# Altium PCB ECG_Final.PcbDoc (part 2 of 3)
Units mil, origin at the board's own origin, x right, y up, seen from the top; angles counter-clockwise.
Board outline 2555.63 x 1380.57 mil, 4 copper layers (Top Layer, Layer 1, Layer 2, Bottom Layer), stack 61.583 mil thick; 110 components, 95 nets, 402 pads, 94 vias.
Unrouted connection lines stored in the file: 82.
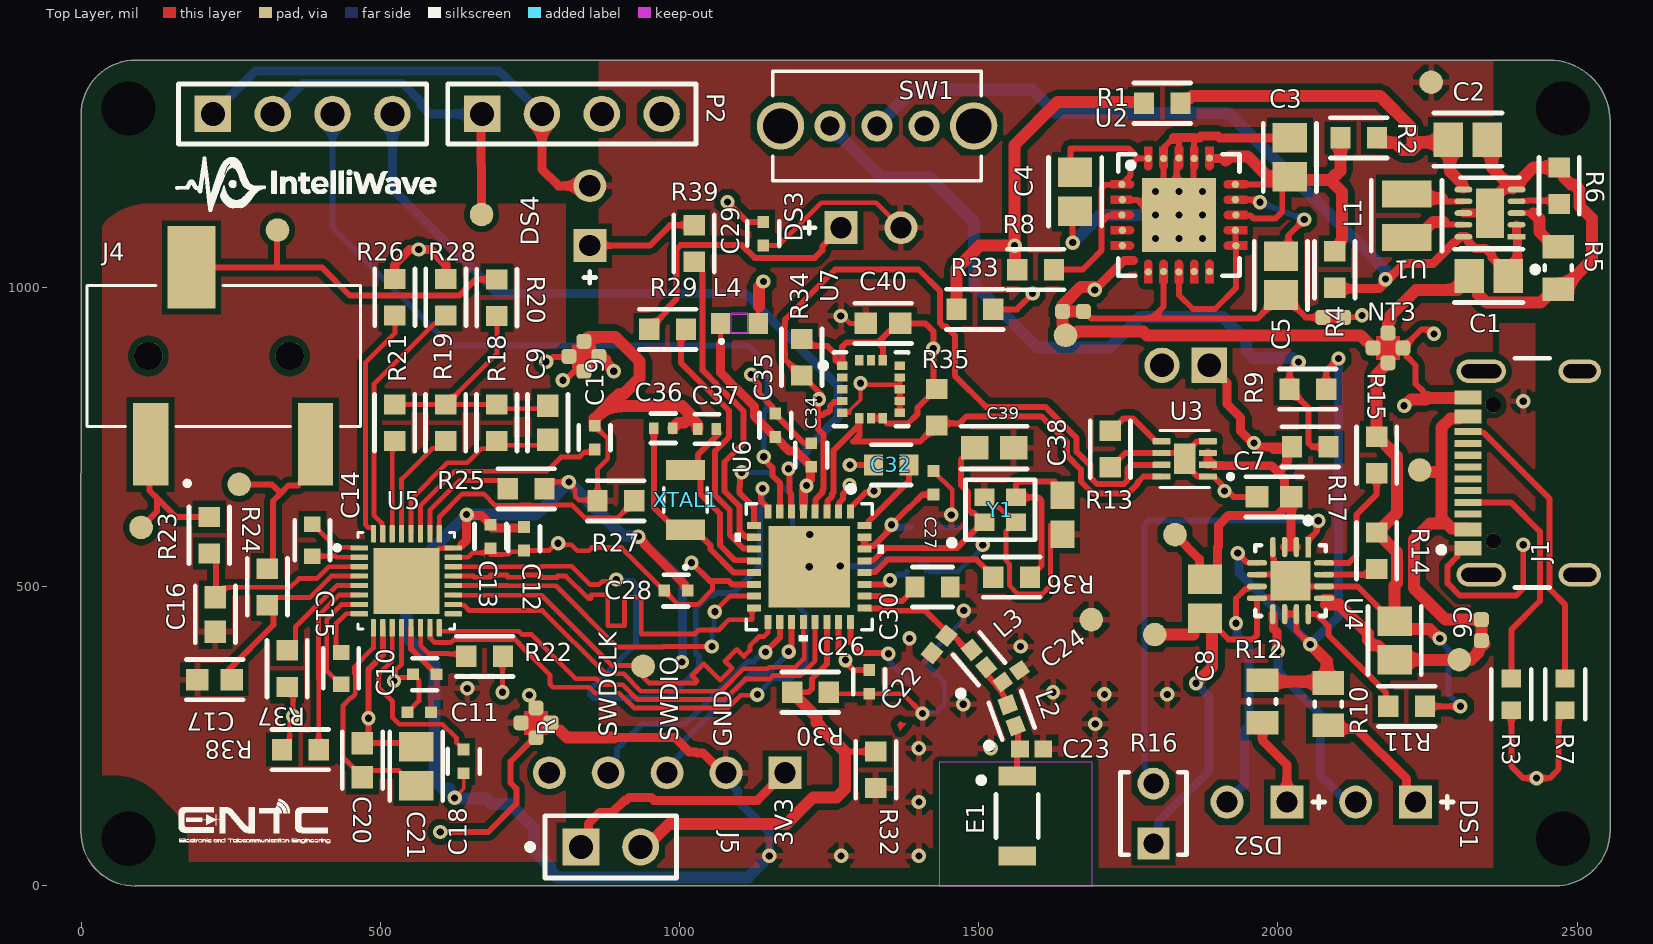
[diagram p0: Top Layer view]

## Part data (continued)
R6: library part "8.25k RES-0603-IPC-B_1", "Res Thin Film 0603 8.25K Ohm 0.1% 0.1W(1/10W) ±25ppm/C Pad SMD T/R Automotive AEC-Q200", Case Code (Imperial)=0603, Case Code (Metric)=1608, Manufacturer=Panasonic, Manufacturer Lifecycle Status=ACTIVE, Manufacturer Part Number=ERA3AEB8251V, Max Operating Temperature=155°C, Max Power Dissipation=100mW, Min Operating Temperature=-55°C, Ratings=AEC-Q200, Resistance=4.7kR, Resistor Type="Thin Film", Temperature Coefficient=50ppm/°C, Tolerance=0.5%, Voltage Rating=75V, Case/Package=0603, Category="Chip SMD Resistors", ComponentLink1Description=https://datasheet.octopart.com:443/ERA3AEB8251V-Panasonic-datasheet-62287448.pdf?src-supplier=Future+Electronics, ComponentLink1URL=https://datasheet.octopart.com:443/ERA3AEB8251V-Panasonic-datasheet-62287448.pdf?src-supplier=Future+Electronics, ComponentLink2Description=https://datasheet.octopart.com:443/ERA3AEB8251V-Panasonic-datasheet-8367715.pdf?src-supplier=Newark, ComponentLink2URL=https://datasheet.octopart.com:443/ERA3AEB8251V-Panasonic-datasheet-8367715.pdf?src-supplier=Newark, ComponentLink3Description=https://datasheet.octopart.com:443/ERA3AEB8251V-Panasonic-datasheet-136531316.pdf?src-supplier=Newark, ComponentLink3URL=https://datasheet.octopart.com:443/ERA3AEB8251V-Panasonic-datasheet-136531316.pdf?src-supplier=Newark, ComponentLink4Description=https://datasheet.octopart.com:443/ERA-3AEB8251V-Panasonic-datasheet-184398012.pdf?src-supplier=Newark, ComponentLink4URL=https://datasheet.octopart.com:443/ERA-3AEB8251V-Panasonic-datasheet-184398012.pdf?src-supplier=Newark, ComponentLink5Description=https://datasheet.octopart.com:443/ERA-3AEB8251V-Panasonic-datasheet-154766165.pdf?src-supplier=JRH+Electronics, ComponentLink5URL=https://datasheet.octopart.com:443/ERA-3AEB8251V-Panasonic-datasheet-154766165.pdf?src-supplier=JRH+Electronics, ComponentLink6Description=https://datasheet.octopart.com:443/ERA3AEB8251V-Panasonic-datasheet-13266200.pdf?src-supplier=_legacy+Avnet, ComponentLink6URL=https://datasheet.octopart.com:443/ERA3AEB8251V-Panasonic-datasheet-13266200.pdf?src-supplier=_legacy+Avnet, ComponentLink7Description=https://datasheet.octopart.com:443/ERA3AEB8251V-Panasonic-datasheet-12510007.pdf?src-supplier=_legacy+Avnet, ComponentLink7URL=https://datasheet.octopart.com:443/ERA3AEB8251V-Panasonic-datasheet-12510007.pdf?src-supplier=_legacy+Avnet, ComponentLink8Description=https://datasheet.octopart.com:443/ERA3AEB8251V-Panasonic-datasheet-11763931.pdf?src-supplier=_legacy+Avnet, ComponentLink8URL=https://datasheet.octopart.com:443/ERA3AEB8251V-Panasonic-datasheet-11763931.pdf?src-supplier=_legacy+Avnet, ComponentLink9Description=https://datasheet.octopart.com:443/ERA3AEB8251V-Panasonic-datasheet-10840895.pdf?src-supplier=_legacy+Avnet, ComponentLink9URL=https://datasheet.octopart.com:443/ERA3AEB8251V-Panasonic-datasheet-10840895.pdf?src-supplier=_legacy+Avnet, ComponentLink10Description=https://datasheet.octopart.com:443/ERA3AEB8251V-Panasonic-datasheet-5392808.pdf?src-supplier=_legacy+Avnet, ComponentLink10URL=https://datasheet.octopart.com:443/ERA3AEB8251V-Panasonic-datasheet-5392808.pdf?src-supplier=_legacy+Avnet, ComponentLink11Description=https://datasheet.octopart.com:443/ERA3AEB8251V-Panasonic-datasheet-188913046.pdf?src-supplier=TME, ComponentLink11URL=https://datasheet.octopart.com:443/ERA3AEB8251V-Panasonic-datasheet-188913046.pdf?src-supplier=TME, ComponentLink12Description=https://sigma.octopart.com:443/150570796/technical_drawing/Panasonic-ERA3AEB8251V.pdf?src-supplier=Panasonic+SCT, ComponentLink12URL=https://sigma.octopart.com:443/150570796/technical_drawing/Panasonic-ERA3AEB8251V.pdf?src-supplier=Panasonic+SCT, ComponentLink13Description=https://datasheet.octopart.com:443/ERA3AEB8251V-Panasonic-datasheet-138783076.pdf?src-supplier=Burklin+Elektronik, ComponentLink13URL=https://datasheet.octopart.com:443/ERA3AEB8251V-Panasonic-datasheet-138783076.pdf?src-supplier=Burklin+Elektronik, ComponentLink14Description=https://datasheet.octopart.com/ERA3AEB8251V-Panasonic-datasheet-78375410.pdf, ComponentLink14URL=https://datasheet.octopart.com/ERA3AEB8251V-Panasonic-datasheet-78375410.pdf, ComponentLink15Description=https://datasheet.octopart.com:443/ERA3AEB8251V-Panasonic---ECG-datasheet-15994758.pdf?src-supplier=Farnell, ComponentLink15URL=https://datasheet.octopart.com:443/ERA3AEB8251V-Panasonic---ECG-datasheet-15994758.pdf?src-supplier=Farnell, ComponentLink16Description=https://datasheet.octopart.com:443/ERA3AEB8251V-Panasonic-datasheet-33006989.pdf?src-supplier=Electro+Sonic, ComponentLink16URL=https://datasheet.octopart.com:443/ERA3AEB8251V-Panasonic-datasheet-33006989.pdf?src-supplier=Electro+Sonic, ComponentLink17Description=https://datasheet.octopart.com:443/ERA-3AEB8251V-Panasonic-datasheet-46744048.pdf?src-supplier=Electro+Sonic, ComponentLink17URL=https://datasheet.octopart.com:443/ERA-3AEB8251V-Panasonic-datasheet-46744048.pdf?src-supplier=Electro+Sonic, Composition="Thin Film", Contact Plating=Tin, Country of Origin=Japan, Depth=800µm, Export Control Classification Number (ECCN) Code=EAR99, Features="Moisture Resistant", Harmonized Tariff Schedule (HTS) Code=8533.21.00.30, Height=0.022inch, Introduction Date=2011-03-24, Lead Free="Lead Free", Length=0.063inch, Lifecycle Status=Production, Military Standard=Not, Mounting Technology="Surface Mount", Number of Terminals=2, Number of Terminations=2, Packaging="Tape and Reel", Part Series="Thin Film Chip Resistors, High Reliability Type", Pins=2, Power Rating=100mW, Pricing="5000=0.0315 (GBP)", Radiation Hardening=No, REACH SVHC=Yes, RoHS=Compliant, RoHS Compliant=Yes, Schedule B="8533210045, 8533210045|8533210045, 8533210045|8533210045|8533210045, 8533210045|8533210045|8533210045|8533210045", Series=AT, Stock=5000, Supplier=Farnell, Supplier Part Number=ERA3AEB8251V, Termination=SMD/SMT, Voltage Rating (DC)=75V, Width=0.032inch, Working Voltage=75V
R10 R12: library part RES-0805-IPC_B
R11 R23 R24: library part "1.18k RES-0603-IPC-B_3", Case/Package=0603, Max Operating Temperature=155°C, Max Power Dissipation=100mW, Min Operating Temperature=-55°C, Resistance=4.7kR, Resistor Type="Thin Film", Temperature Coefficient=50ppm/°C, Tolerance=0.5%, Features="Moisture Resistant", Height=0.022inch, Length=0.063inch, Number of Terminations=2, Packaging="Tape and Reel", RoHS Compliant=Yes, Series=AT, Width=0.032inch
R13: Case/Package=0603, Max Operating Temperature=155°C, Max Power Dissipation=100mW, Min Operating Temperature=-55°C, Resistance=4.7kR, Resistor Type="Thin Film", Temperature Coefficient=50ppm/°C, Tolerance=0.5%, Features="Moisture Resistant", Height=0.022inch, Length=0.063inch, Number of Terminations=2, Packaging="Tape and Reel", RoHS Compliant=Yes, Series=AT, Width=0.032inch
R14: library part "4.12k RES-0603-IPC-B_1", Case/Package=0603, Max Operating Temperature=155°C, Max Power Dissipation=100mW, Min Operating Temperature=-55°C, Resistance=4.7kR, Resistor Type="Thin Film", Temperature Coefficient=50ppm/°C, Tolerance=0.5%, Features="Moisture Resistant", Height=0.022inch, Length=0.063inch, Number of Terminations=2, Packaging="Tape and Reel", RoHS Compliant=Yes, Series=AT, Width=0.032inch
R15: library part "1.13k RES-0603-IPC-B_2", Case/Package=0603, Max Operating Temperature=155°C, Max Power Dissipation=100mW, Min Operating Temperature=-55°C, Resistance=4.7kR, Resistor Type="Thin Film", Temperature Coefficient=50ppm/°C, Tolerance=0.5%, Features="Moisture Resistant", Height=0.022inch, Length=0.063inch, Number of Terminations=2, Packaging="Tape and Reel", RoHS Compliant=Yes, Series=AT, Width=0.032inch
R16: library part CMP-02404-000013-1, "THERM NTC 10KOHM 3435K RADIAL", Case/Package=Radial, Max Operating Temperature=125°C, Max Power Dissipation=250mW, Min Operating Temperature=-40°C, Tolerance=1%, Mount="Through Hole", Packaging=Bulk, RoHS Compliant=Yes
R18 R37 R38: library part "1M RES-0603-IPC-B_3", Case/Package=0603, Max Operating Temperature=155°C, Max Power Dissipation=100mW, Min Operating Temperature=-55°C, Resistance=4.7kR, Resistor Type="Thin Film", Temperature Coefficient=50ppm/°C, Tolerance=0.5%, Features="Moisture Resistant", Height=0.022inch, Length=0.063inch, Number of Terminations=2, Packaging="Tape and Reel", RoHS Compliant=Yes, Series=AT, Width=0.032inch
R19 R20 R32: library part "100k RES-0603-IPC-B_1", Case/Package=0603, Max Operating Temperature=155°C, Max Power Dissipation=100mW, Min Operating Temperature=-55°C, Resistance=4.7kR, Resistor Type="Thin Film", Temperature Coefficient=50ppm/°C, Tolerance=0.5%, Features="Moisture Resistant", Height=0.022inch, Length=0.063inch, Number of Terminations=2, Packaging="Tape and Reel", RoHS Compliant=Yes, Series=AT, Width=0.032inch
R21: library part "1k RES-0603-IPC-B_1", Case/Package=0603, Max Operating Temperature=155°C, Max Power Dissipation=100mW, Min Operating Temperature=-55°C, Resistance=4.7kR, Resistor Type="Thin Film", Temperature Coefficient=50ppm/°C, Tolerance=0.5%, Features="Moisture Resistant", Height=0.022inch, Length=0.063inch, Number of Terminations=2, Packaging="Tape and Reel", RoHS Compliant=Yes, Series=AT, Width=0.032inch
R22 R25 R26 R27 R28 R30 R34 R35: library part "10k RES-0603-IPC-B_1_1", Case/Package=0603, Max Operating Temperature=155°C, Max Power Dissipation=100mW, Min Operating Temperature=-55°C, Resistance=4.7kR, Resistor Type="Thin Film", Temperature Coefficient=50ppm/°C, Tolerance=0.5%, Features="Moisture Resistant", Height=0.022inch, Length=0.063inch, Number of Terminations=2, Packaging="Tape and Reel", RoHS Compliant=Yes, Series=AT, Width=0.032inch
SW1: "Description", Manufacturer_Name="C&K Components", Copyright="Copyright (C) 2025 Ultra Librarian. All rights reserved.", Manufacturer_Part_Number=OS102011MA1QN1, RefDes=RefDes, Type=Type
U1: library part CMP-04918-000700-1, "1.8-V TO 5.5-V, 75-NA IQ BUCK-BO", RoHS Compliant=Yes
U2: library part CMP-04917-000027-1, "IC REG LINEAR POS ADJ 1A 20VQFN", Dropout Voltage=307mV, Manufacturer="Texas Instruments", Max Junction Temp=+125°C, Max Supply Voltage=35V, Min Supply Voltage=3V, Nominal Supply Current=0.58-6.1mA, Output Current=1A, Output Voltage=1.4-20.5V, Package=RGW0020A, Temperature="-40°C to +125°C", Temperature Range Low=-40°C, Accuracy Percentage=1%, Automotive=No, Category=IC, ComponentLink2Description=Datasheet, ComponentLink2URL=http://www.ti.com/lit/ds/symlink/tps7a47.pdf, Device Class L1="Integrated Circuits (ICs)", Device Class L2="Power Management ICs", Device Class L3="Voltage Regulators - Linear", Digikey Description="IC REG LINEAR POS ADJ 1A 20VQFN", Height=1mm, Lead Free=Yes, Manufacturer Part Number=TPS7A4700RGWR, Mouser Description="LDO Voltage Regulators Low Noise,1A,Hi Vltg LDO Reg", Number of Outputs=1, Octopart=https://octopart.com/tps7a4700rgwr-texas+instruments-21221956, Output Type=AdjustableProgrammable, RoHS=TRUE, Standoff Height=0mm, Temperature Range High=+125°C
U3: "3ÂµA 1-Cell/2-Cell Fuel Gauge with ModelGauge", Package="TDFN-8 Maxim", Availability="In Stock", Check_prices=https://www.snapeda.com/parts/MAX17048G+T10/Analog+Devices/view-part/?ref=eda, MF="Analog Devices", MP=MAX17048G+T10, Price=None, Purchase-URL=https://pricing.snapeda.com/search/part/MAX17048G+T10/?ref=eda, SnapEDA_Link=https://www.snapeda.com/parts/MAX17048G+T10/Analog+Devices/view-part/?ref=snap
U4: library part CMP-0321-00220-3, "IC LI-ION CHARGE MGMT 16-QFN", Battery Pack Voltage=4.2V, Case/Package=VQFN, Max Charge Current=1.5A, Max Operating Temperature=125°C, Max Supply Voltage=10.2V, Min Input Voltage=4.3V, Min Operating Temperature=-40°C, Min Supply Voltage=4.35V, Package Quantity=3000, Battery Chemistry=LITHIUM-ION, Contact Plating=Gold, Fault Protection="Over Voltage", Interface=USB, Lead Free="Lead Free", Number of Cells=1, Number of Pins=16, Output Current=1.5A, Output Voltage=4.2V, Packaging="Tape and Reel", Radiation Hardening=No, RoHS Compliant=Yes, Series=-, Weight=0.000808oz
U5: "24-bit, 2-ch, Low-Power Analog Front END (AFE) for ECG Applications", Package="VQFN-32 Texas Instruments", Check_prices=https://www.snapeda.com/parts/ADS1292IRSMR/Texas+Instruments/view-part/?ref=eda, MF="Texas Instruments", MP=ADS1292IRSMR, SnapEDA_Link=https://www.snapeda.com/parts/ADS1292IRSMR/Texas+Instruments/view-part/?ref=snap
U6: "Ultra-low-power, Arm Cortex-M33 Trust Zone MCU 100 MHz with 1 Mbyte of Flash memory,  Bluetooth LE 5.4", Manufacturer_Name=STMicroelectronics, Copyright="Copyright (C) 2025 Ultra Librarian. All rights reserved.", Manufacturer_Part_Number=STM32WBA52KGU6, RefDes=RefDes, Type=Type
U7: library part CMP-0234-00055-6, "ACCEL 2-16G I2C/SPI 16LGA", Case/Package=LGA, Max Operating Temperature=85°C, Max Supply Voltage=3.6V, Min Operating Temperature=-40°C, Min Supply Voltage=1.71V, Operating Supply Current=11uA, Operating Supply Voltage=2.5V, Package Quantity=1, Axis="X, Y, Z", Bandwidth=5kHz, Contact Plating=Gold, Depth=3mm, Height=1mm, Interface=I2C, Lead Free="Lead Free", Length=3mm, Max Supply Voltage (DC)=3.6V, Min Supply Voltage (DC)=1.71V, Number of Pins=16, Output Type=Digital, Packaging="Tape and Reel", Radiation Hardening=No, REACH SVHC="No SVHC", Resolution=16b, RoHS Compliant=Yes, Sensor Type="3 Axis", Series=-, Width=3mm
XTAL1: "Description", Manufacturer_Name=NDK, Copyright="Copyright (C) 2025 Ultra Librarian. All rights reserved.", Manufacturer_Part_Number=NX3215SA-32.768K-STD-MUA-14, Type=Crystals
Y1: library part CMP-200220-000017-1, "CRYSTAL 32.0000MHZ 8PF SMD", Case/Package=SMD/SMT, ESR (Equivalent Series Resistance)=60R, Frequency=32MHz, Load Capacitance=8pF, Max Operating Temperature=125°C, Min Operating Temperature=-40°C, Ratings=AEC-Q200, Mount="Surface Mount", Packaging="Tape and Reel"

## Free pads (board coordinates)
  round 0 hole 90.55: 2(78.74,78.74) 2(78.74,1299.21) 2(2476.34,78.74) 2(2476.34,1299.21)
  round 39.37 smd: 3(100,599) 3(264,671) 3(328,1096) 3(669,1122) 3(939,367) 3(1645,920) 3(1688,445) 3(1794,420) 3(1828,587) 3(2237,695) 3(2256,1343) 3(2303,378)

## Via types
v1: diameter 24, hole 12, Top Layer to Bottom Layer, 84 vias
v2: diameter 23.62, hole 11.81, Top Layer to Bottom Layer, 9 vias
v3: diameter 24/24/24/24 (per signal layer), hole 12, Top Layer to Bottom Layer, 1 vias

## Nets (pads, with @x,y where several pads share a name; then routed paths per layer and width w, separated by ;. In a path a pad name is that pad's centre, name@x,y a point inside that pad or via, vN(x,y) a via of type N, cw(c..) or ccw(c..) an arc to the next point about the centre after c; other vN are vias at no path point)
5V: C6.2 NT1.2 pad.3@2303,378 U4.13 | length 335.8
  Top Layer w15: U4.13@2077.05,480.63 U4.13@2088.81,480.63
  Top Layer w20: 2080,470 2102.49,470 2150.33,422.15 2150.33,411.19 2159.71,401.81 2166.71,401.81 2191.03,377.49 2322.49,377.49 2335,390 2335,394.32 2345,404.32 NT1.2@2345,405
ADC1: P1.4 U6.6 | length 1252
  Top Layer w10: v1(1182,697) 1183.43,695.57 1183.43,658.68 1186.09,656.02 U6.6@1186.09,625.91
  Bottom Layer w15: P1.4@520,1290 520,1165 695,990 1110,990 1264.55,835.45 1264.55,782.38 1212.19,730.02 1212.19,726.21 1182.98,697 v1(1182,697)
ADC2: P1.3 U6.7 | length 1270.1
  Top Layer w10: v1(1140.67,717) 1140.67,713.21 1155,698.88 1155,685.82 1167.43,673.39 U6.7@1167.43,625.91
  Bottom Layer w10: P1.3@420,1290 420,1100 617,903 1114.54,903 1146.61,870.93 1146.61,797.05 1140.67,791.1 v1(1140.67,717)
ADC3: 
ADC4: 
ADS_CS: U5.18 U6.20 | length 730.3
  Top Layer w8: U5.18@621.87,470.38 622.2,470.05 634.81,470.05 635.89,468.96 639.94,468.96 648.91,460 770.71,460 876.34,354.37 906.34,354.37 935.47,325.24 1069.22,325.24 1106.72,362.74 1146.94,362.74 1149.6,365.39 1193.03,365.39 1208.26,380.62 1208.26,406.12 1206.81,407.57 U6.20@1206.81,440.87
ADS_DIN: pad.3@939,367 U5.19 U6.17 | length 718.1
  Top Layer w8: U5.19@621.87,486.13 622.2,485.8 769.2,485.8 857.5,397.5 886.63,368.37 919.55,368.37 948.68,339.24 1020.7,339.24 1026.36,339.24 1029.67,342.55 1020.71,351.51 1040.51,371.31 1068,343.82 1087.8,363.62 1075.89,375.53 1095.69,395.32 1107.6,383.42 1117.63,393.44 1117.63,401.58 1132.71,416.66 1140.85,416.66 1144.19,420 1147.74,423.55 U6.17@1147.74,440.87
ADS_DOUT: U5.21 U6.16 | length 731.4
  Top Layer w8: U5.21@621.87,517.62 624.03,517.62 656.04,517.62 656.04,515.88 684.04,515.88 684.04,519.37 712.04,519.37 712.04,515.88 740.04,515.88 740.04,519.37 768.04,519.37 768.04,515.55 796.04,515.55 796.04,517.62 810.06,517.62 847.35,480.34 852.04,480.34 852.04,486.54 880.04,486.54 880.04,434.76 908.04,434.76 908.04,482.2 936.04,482.2 936.04,420.71 1024.9,420.71 1031.75,427.55 1065.44,427.55 1082.55,444.65 1103.52,444.65 1117.05,444.65 1120.91,444.65 1120.91,462.59 1122.81,464.5 U6.16@1124.13,464.5
ADS_DRDY: U5.22 U6.8 | length 1160.3
  Top Layer w8: U5.22@621.87,533.37 770.72,533.37 771.35,534 819.99,534 850.44,503.55 865.22,503.55 870.61,508.94 890.94,508.94 v1(894,512)
  Top Layer w10: v1(1138.47,664.16) 1136.16,661.85 1136.16,643.4 1146.83,632.73 1146.83,626.82 U6.8@1147.74,625.91
  Bottom Layer w10: v1(894,512) 896.2,509.8 921,509.8 927.24,503.55 927.24,405.06 850.31,328.13 850.31,319.85 856.17,313.99 981.95,313.99 1032.66,364.69 1032.66,383.16 1027,388.82 1027,464.06 1047.87,484.94 1056.28,484.94 1060.63,489.29 1089.29,489.29 1134,534 1134,632.16 1138.47,636.63 v1(1138.47,664.16)
ADS_RESET: U5.15 U6.9 | length 1229.5
  Top Layer w8: U5.15@582.7,431.21 583.03,430.88 583.03,414.22 590.61,406.64 617.64,406.64 622.51,411.51 725.76,411.51 731.62,405.65 731.62,404.24 783.57,352.28 783.57,336.69 788.26,332 849.11,332 859.11,322 899.11,322 923.88,297.24 1080.82,297.24 1102,318.42 1128.79,318.42 v1(1130,319.63)
  Top Layer w10: v1(1104,691) 1101.32,688.32 1101.32,668.49 1100,667.17 1100,657.17 1120.67,636.51 1120.67,636.25 1124.13,632.78 U6.9@1124.13,602.29
  Bottom Layer w8: v1(1104,691) 1148.45,691 1188.53,650.92 1188.53,476.76 1211.09,454.19 1211.09,370.41 1187.42,346.74 1156.74,346.74 1130,320 v1(1130,319.63)
ADS_SCLK: U5.20 U6.15 | length 611.7
  Top Layer w8: U5.20@621.87,501.88 712.24,501.88 712.56,501.55 793.45,501.55 895.9,399.1 972.15,399.1 973.05,400 v1(1054,400) ; v1(1059.06,457.94) 1059.06,459.06 1084.18,484.18 U6.15@1124.13,484.18
  Bottom Layer w8: v1(1054,400) 1054,429.93 1058,433.94 1058,456.88 v1(1059.06,457.94)
ADS_START: U5.16 U6.21 | length 772.5
  Top Layer w8: U5.16@598.44,431.21 598.44,425.84 598.77,425.51 731.56,425.51 737.07,420 752.68,420 826.68,346 860.79,346 870.79,336 904.91,336 929.67,311.24 1075.02,311.24 1109.42,345.63 1149.63,345.63 1155.39,351.39 1201.81,351.39 1226.5,376.08 U6.21@1226.5,440.87